# Altium PCB Analog_Project_Mixer_output.PcbDoc
Units mil, origin at the board's own origin, x right, y up, seen from the top; angles counter-clockwise.
Board outline 3300 x 2510.89 mil, 2 copper layers (Top Layer, Bottom Layer); 40 components, 27 nets, 106 pads, 7 vias.
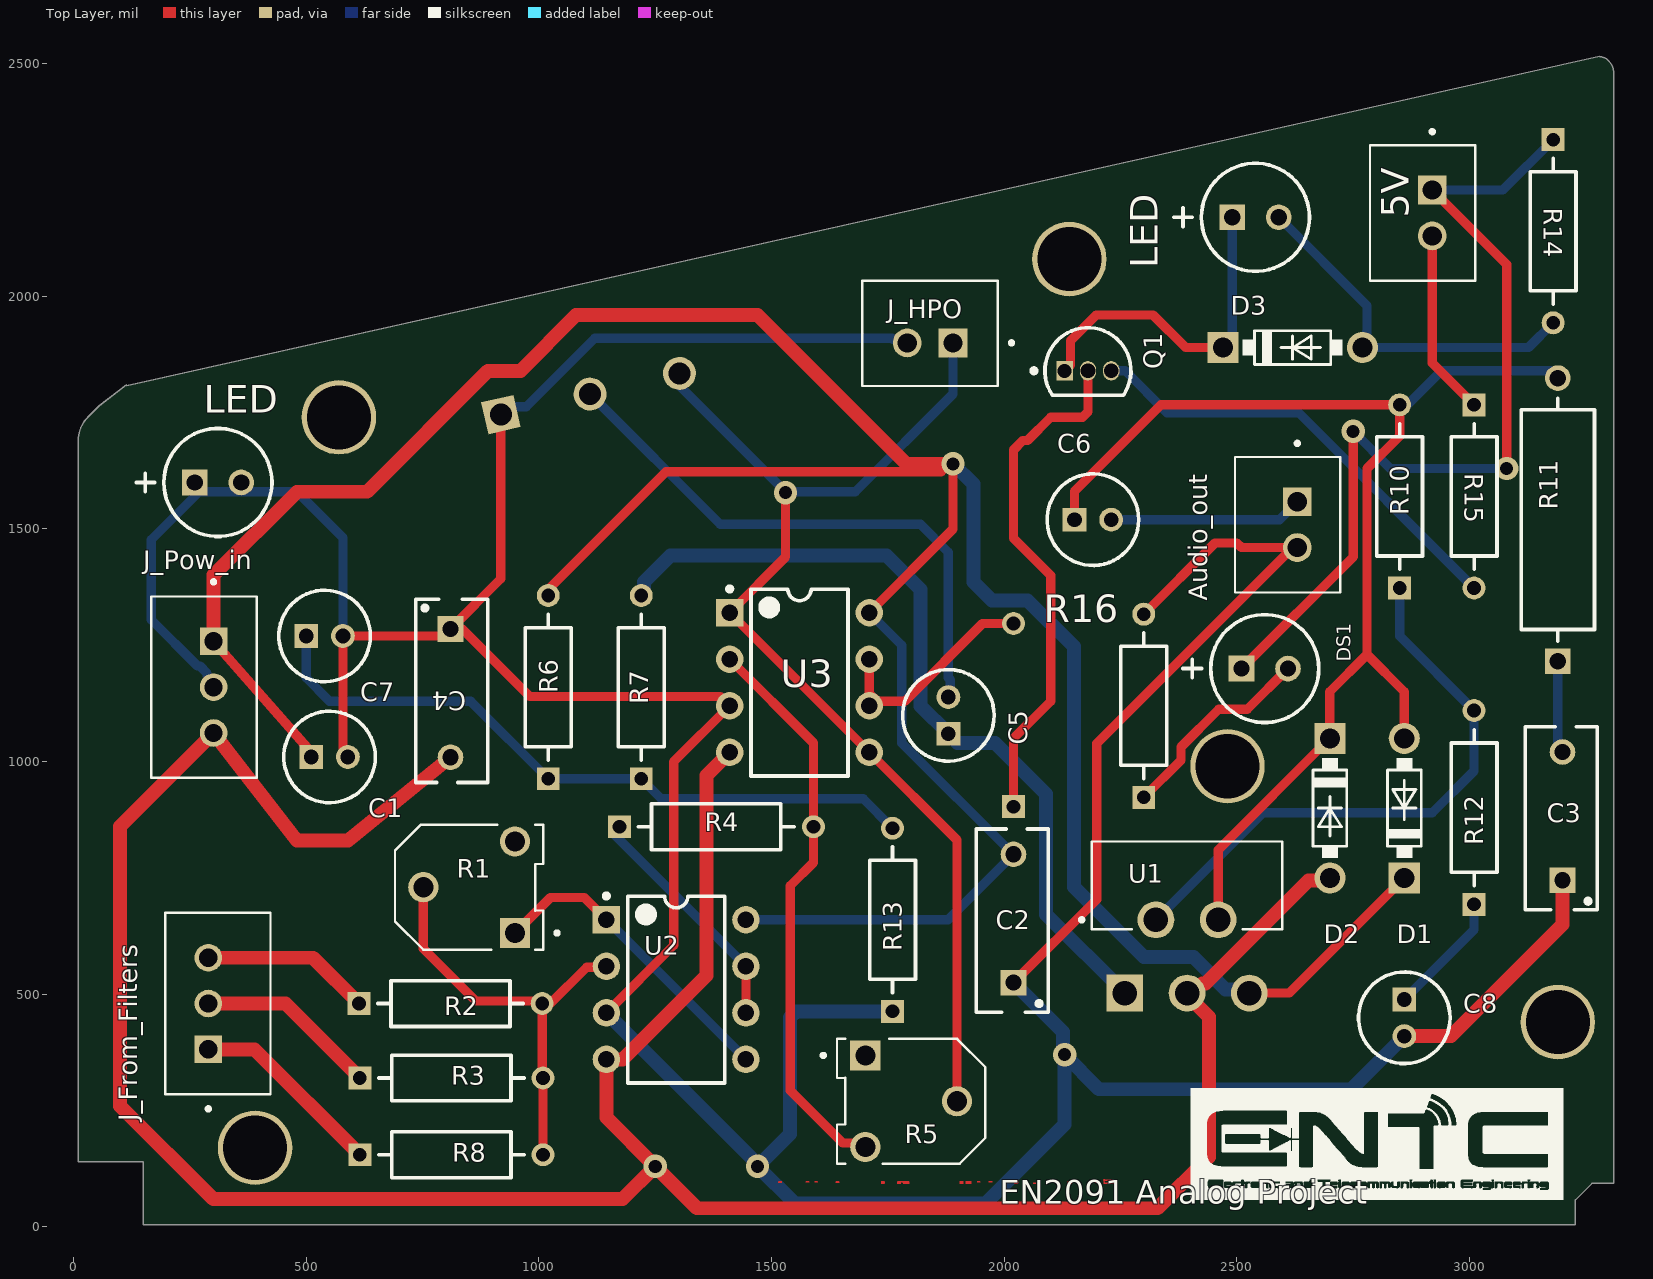
[diagram p0: Top Layer view]
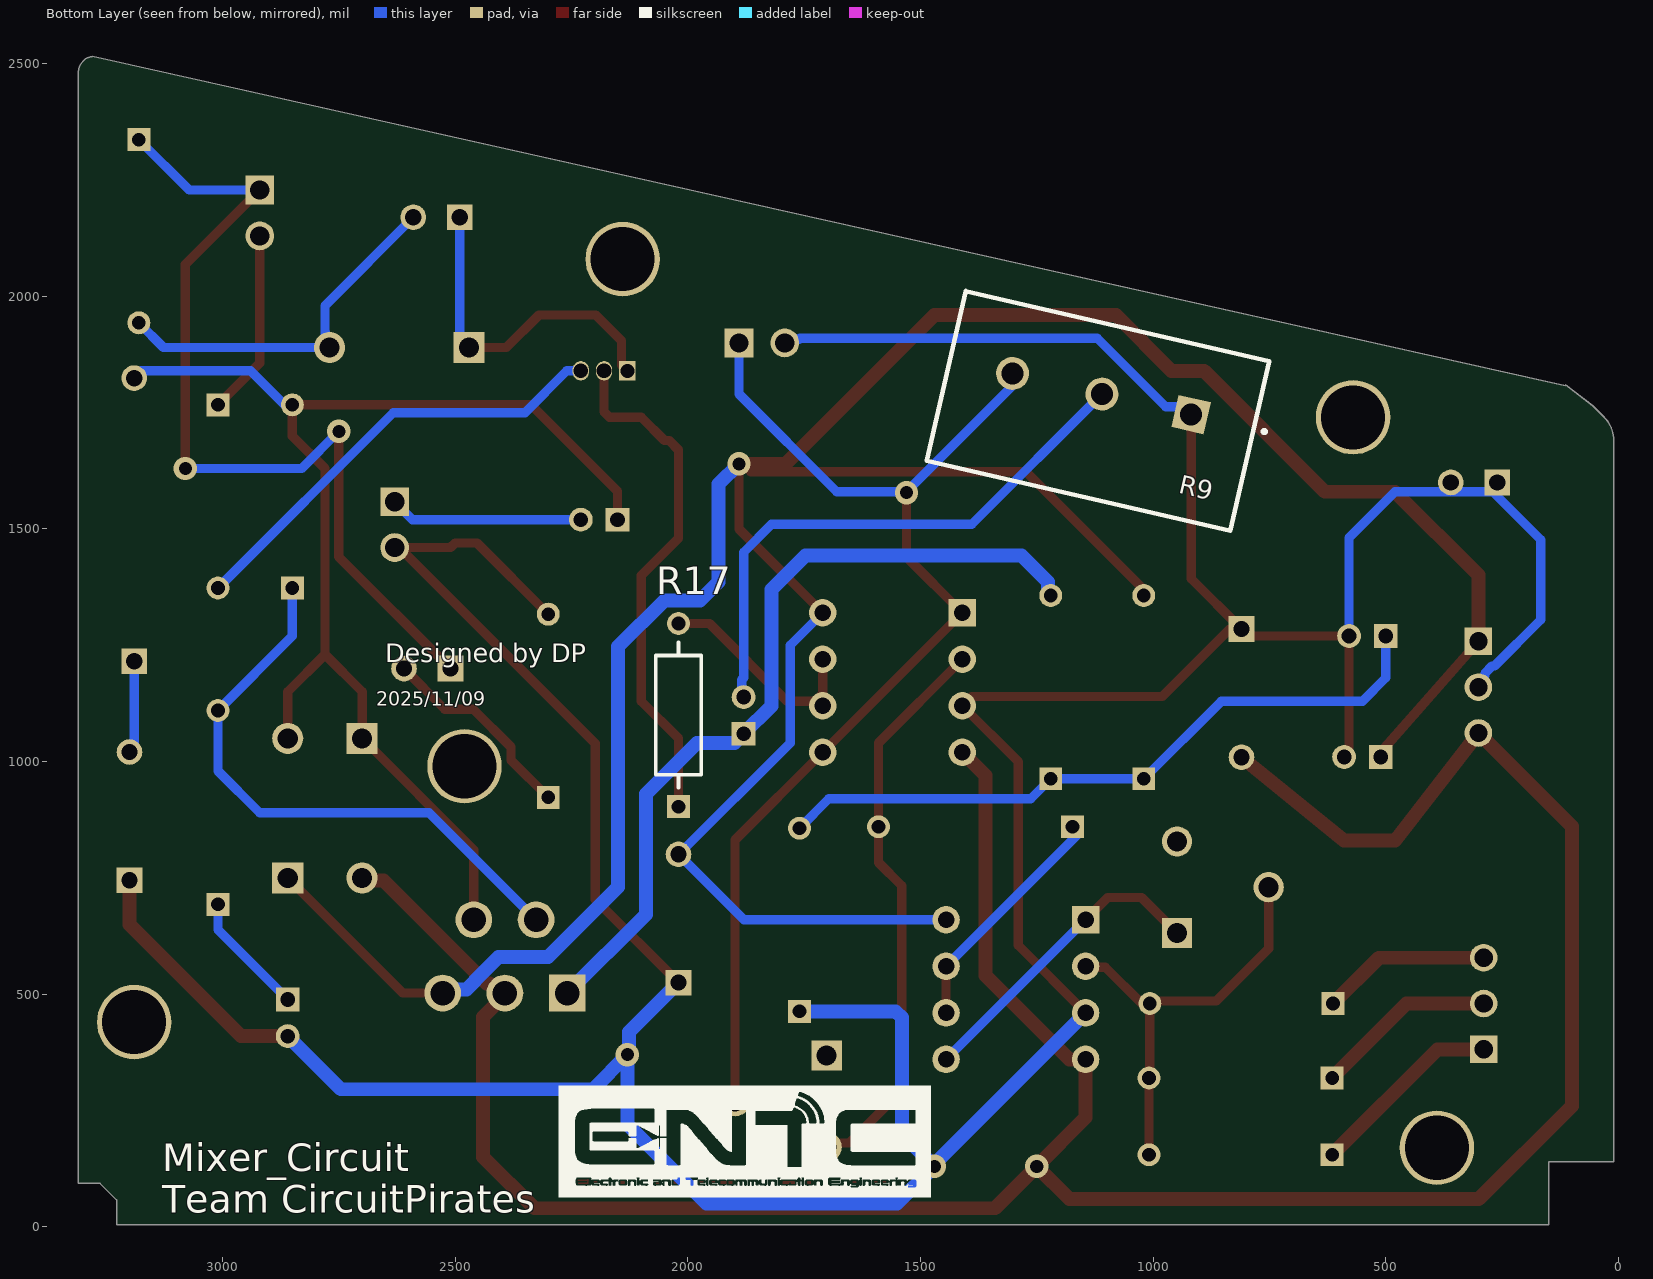
[diagram p1: Bottom Layer view, seen from below]
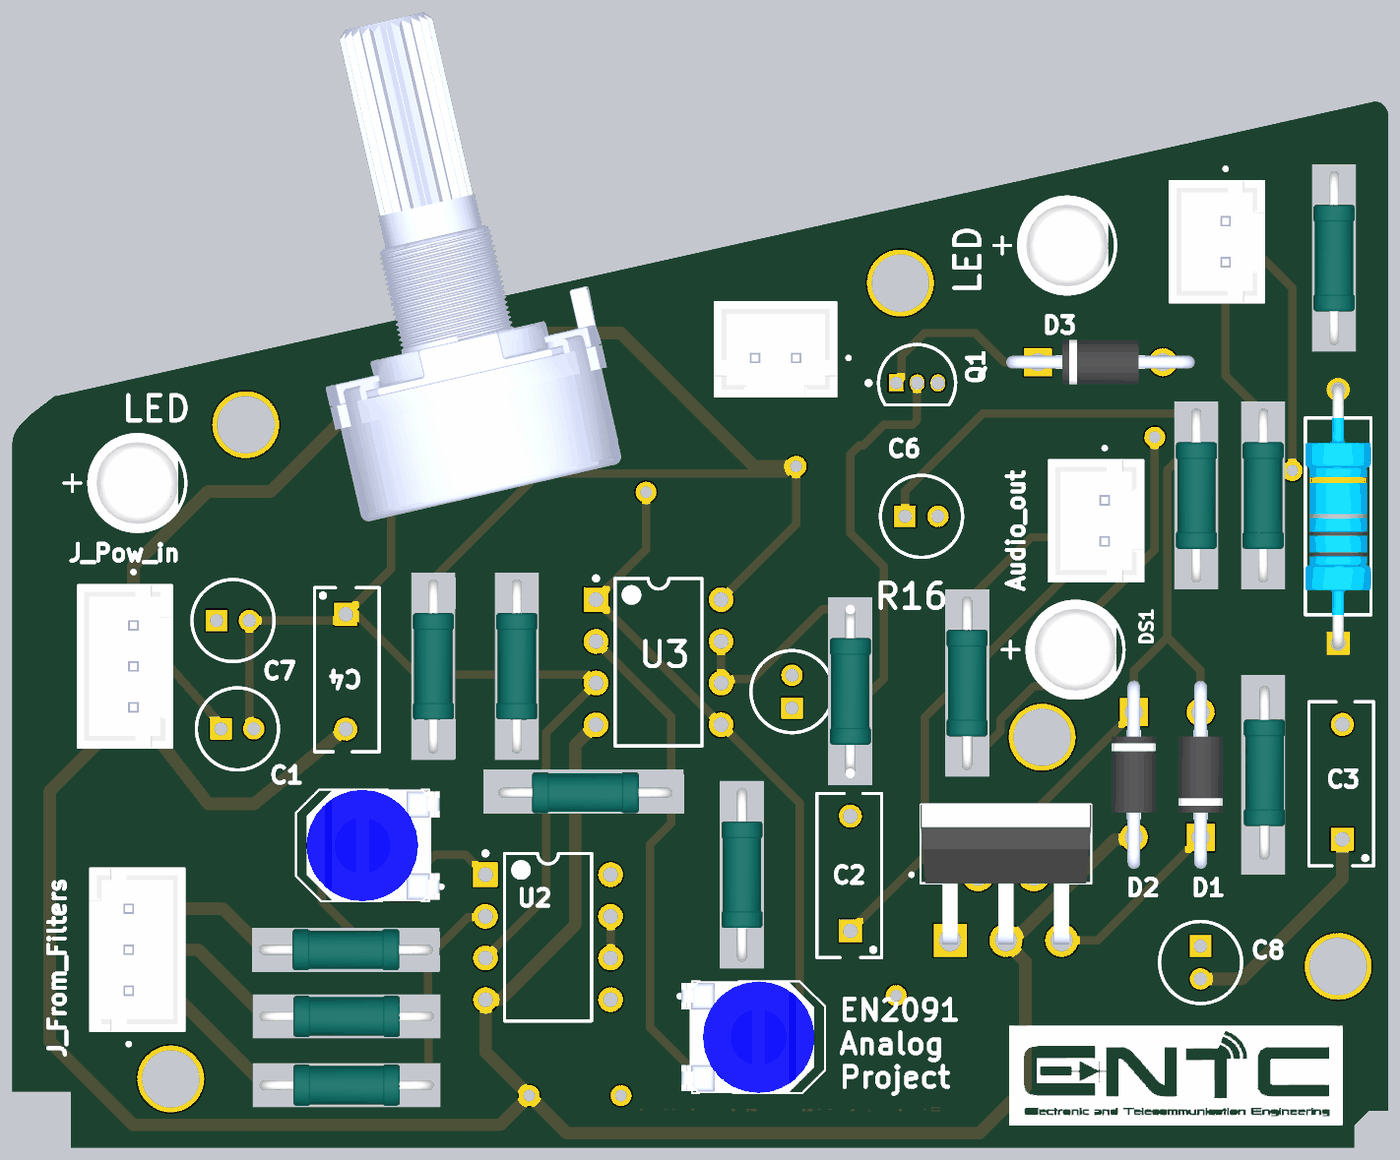
[diagram p2: 3D render of the assembled board from above, using the file's embedded part models]

## Layer stack, top to bottom
Top Solder: solder mask 0.4, Solder Resist, Dk 3.5
Top Layer: signal copper 1.4
Dielectric 1: dielectric 12.6, FR-4, Dk 4.8
Bottom Layer: signal copper 1.4
Bottom Solder: solder mask 0.4, Solder Resist, Dk 3.5

## Board outline
10,140 10,1690 cw(c82.43,1690) 31.21,1741.21 55,1765 54.99,1764.98 113.38,1809.71 113.74,1808.12 3279.8,2515.89 3280,2515 cw(c3280,2490.86) 3297.07,2507.93 3300,2505 cw(c3275.86,2480.86) 3310,2480.86 3310,93.28 3263.28,93.28 3227.93,57.93 3227.93,5.01 150,5.01 150,140

## Design rules (kind name [scope] priority, off if disabled: settings)
Clearance [All] p1: gap=10 ignorepadtopadclearanceinfootprint=FALSE
PolygonConnect [All] p1: connectstyle=Relief reliefconductorwidth=10 reliefentries=4 polygonreliefangle="90 Angle" airgapwidth=10
RoutingVias [All] p1: holewidth=28 width=50 viastyle="Through Hole" minholewidth=28 minwidth=50 maxholewidth=28 maxwidth=50
SolderMaskExpansion [All] p1: expansion=4 istentingtop=FALSE
SupplyNets "Schematic Supply Nets" [InNet('GND')] p1: voltage=0.000
Width [All] p1: maxlimit=30 minlimit=10 preferedwidth=20
30 further rules are at their usual default settings.

## Components (designator, comment, footprint, x,y, rotation, side; value= is the part's Value field where it differs from the comment)
5V "B2B-XH-A_(LF)(SN)" JST_B2B-XH-A_(LF)(SN) 2899.33,2179.21 r90 top
Audio_out "B2B-XH-A_(LF)(SN)" JST_B2B-XH-A_(LF)(SN) 2609.33,1509.21 r90 top
C1 "ECA1HM100" "10uF 25V" 550,1010 r0 top
C2 "100nF 50V Ceramic" "100nF Cap" 2020,660 r90 top
C3 "220nF 50V Ceramic" "100nF Cap" 3200,880 r90 top
C4 "100nF 50V Ceramic" "100nF Cap" 810,1150 r270 top
C5 "ECA1HM100" "10uF 25V" 1880,1099.37 r90 top
C6 "ECA1HM100" "10uF 25V" 2190.63,1520 r0 top
C7 "22uF 50V" "10uF 25V" 539.37,1270 r0 top
C8 "22uF" "10uF 25V" 2860,449.37 r270 top
D1 "1N4001" 1N400X 2860,900 r90 top
D2 "1N4001" 1N400X 2700,900 r270 top
D3 "1N4001" 1N400X 2620,1890 r0 top
DS1 "WP7113SGD" KING-WP7113SGD_V 2560,1200 r0 top
J_From_Filters "B3B-XH-A_(LF)(SN)" "JST_B3B-XH-A (LF)(SN)" 310,480 r270 top
J_HPO "B2B-XH-A_(LF)(SN)" JST_B2B-XH-A_(LF)(SN) 1840.79,1920.67 r0 top
J_Pow_in "B3B-XH-A_(LF)(SN)" "JST_B3B-XH-A (LF)(SN)" 280,1160 r90 top
LED "Comment" KING-WP7113SGD_V 310,1600 r0 top
LED "Comment" KING-WP7113SGD_V 2540,2170 r0 top
Q1 "BC547B" BC547B 2180,1840 r0 top
R1 "TRIM_pot" TRIM_Pot 850,730 r0 top
R2 "22K 0.25W" "0.25W Carbon film" 810,480 r0 top
R3 "22K 0.25W" "0.25W Carbon film" 811.85,320 r0 top
R4 "1K 0.25W" "0.50W Carbon film" 1370,860 r0 top value=1kΩ
R5 "TRIM_pot" TRIM_Pot 1800,270 r180 top
R6 "100K 0.25W" "0.25W Carbon film" 1020,1160 r90 top
R7 "100K 0.25W" "0.25W Carbon film" 1220,1160 r90 top
R8 "22K 0.25W" "0.25W Carbon film" 811.85,155 r0 top
R9 "Rotary_Pot" Rotary_pot 918.19,1745.72 r13 bottom
R10 "150K 0.25W" "0.25W Carbon film" 2850,1570 r90 top
R11 "1Ohm 5W" "0.5W resistor" 3190,1520 r90 top
R12 "4.7K 0.25W" "0.50W Carbon film" 3010,890 r90 top
R13 "100K 0.25W" "0.25W Carbon film" 1760,660 r90 top
R14 "1K 0.25W" "0.25W Carbon film" 3180,2140 r270 top value=1kΩ
R15 "1K 0.5W" "0.25W Carbon film" 3010,1570 r270 top value=1kΩ
R16 "1K 0.25W" "0.25W Carbon film" 2300,1120 r90 top value=1kΩ
R17 "1K 0.25W" "0.25W Carbon film" 2020,1100 r90 bottom value=1kΩ
U1 "TDA2030A" TDA2030A 2393.07,660 r0 top
U2 "NE5532AP" NE5532 1295,510 r0 top
U3 "NE5532AP" NE5532 1560,1170 r0 top

## Footprints (in the part's own frame and the unit in brackets; to place one, negate y for a bottom-side part, rotate by r counter-clockwise, add the part's x,y. Pads: shape width x height; smd on the part's side, far side on the other; paste and mask are expansions set on the pad)
"0.5W resistor" [mm]
  rect 1.4x1.4 hole 0.9 paste-2539.97 mask+0: 1(-7.73,0)
  round 1.4 hole 0.9 paste-2539.97 mask+0: 2(7.73,0)
  silkscreen extent -6.63,-2 6.63,2, body extent -8.53,-2.1 8.53,2.1, height 0.25
"0.25W Carbon film" [mm]
  rect 1.25x1.25 hole 0.75 paste-2539.97 mask+0: 1(-5,0)
  round 1.25 hole 0.75 paste-2539.97 mask+0: 2(5,0)
  silkscreen extent -3.98,-1.25 3.98,1.25, body extent -5.72,-1.35 5.72,1.35, height 0.25
"0.50W Carbon film" [mm]
  rect 1.25x1.25 hole 0.75 paste-2539.97 mask+0: 1(-5,0)
  round 1.25 hole 0.75 paste-2539.97 mask+0: 2(5.588,0)
  silkscreen extent -3.98,-1.25 4.53,1.25, body extent -5.35,-1.43 6.1,1.27, height 0.25
1N400X [mm]
  round 1.7 hole 1.1: A(3.81,0)
  rect 1.7x1.7 / inner round 1.7 / far side rect 1.7x1.7 hole 1.1: C(-3.81,0)
  silkscreen extent -2.72,-0.95 2.72,0.92, body extent -5.74,-1.35 5.74,1.35, height 2.74
"10uF 25V" [mm] "THD, 2-Leads, Dia 5mm, Body Length 11mm"
  rect 1.3x1.3 hole 0.8: 1(-1,0)
  round 1.3 hole 0.8: 2(1,0)
  silkscreen extent -2.5,-2.5 2.5,2.5, body extent -2.5,-2.5 2.5,2.5, height 12
"100nF Cap" [mil] "THD, 2-Leads, Body 4x2.6mm"
  rect 55x55 hole 35: 1(-135,0)
  round 55 hole 35: 2(140.59,0)
  silkscreen extent -199,-75 195,80, body extent -199,-76 192,80, height 10
BC547B [mm] "TO, 3-Leads, Body Dia 4.7mm, Pitch 1.27mm"
  rect 0.889x1.05 hole 0.762: 1(-1.27,0)
  oval 0.889x1.05 hole 0.8: 2(0,0) 3(1.27,0)
  silkscreen extent -3.07,-1.34 2.35,2.35, body extent -2.35,-1.33 2.36,2.36, height 7.87
JST_B2B-XH-A_(LF)(SN) [mm]
  rect 1.575x1.575 / inner round 1.575 / far side rect 1.575x1.575 hole 1.05: 1(1.25,-0.525)
  round 1.575 hole 1.05: 2(-1.25,-0.525)
  silkscreen extent -3.7,-2.88 4.54,2.88, body extent -3.7,-2.88 3.7,2.88, height 7
"JST_B3B-XH-A (LF)(SN)" [mm]
  rect 1.508x1.508 / inner round 1.508 / far side rect 1.508x1.508 hole 1: 1(2.5,-0.525)
  round 1.508 hole 1: 2(0,-0.525) 3(-2.5,-0.525)
  silkscreen extent -4.95,-2.88 5.85,2.88, body extent -4.95,-2.88 4.95,2.88, height 7
KING-WP7113SGD_V [mm] "THD, 2-Leads, Dia 5.9mm, Body Length 8.6mm"
  rect 1.4x1.4 hole 0.889: 1(-1.27,0)
  round 1.4 hole 0.889: 2(1.27,0)
  silkscreen extent -4.47,-2.95 2.95,2.95, body extent -2.95,-2.95 2.5,2.95, height 15.5
NE5532 [mm] "DIP, 8-Leads, Body 10.15x6.6mm, Pitch 2.54mm"
  rect 1.5x1.5 hole 0.9: 1(-3.81,3.81)
  round 1.5 hole 0.9: 2(-3.81,1.27) 3(-3.81,-1.27) 4(-3.81,-3.81) 5(3.81,-3.81) 6(3.81,-1.27) 7(3.81,1.27) 8(3.81,3.81)
  silkscreen extent -3.93,-5.1 2.65,5.23, body extent -3.95,-5.07 3.95,5.07, height 5.08
Rotary_pot [mm]
  rect 1.8x1.8 / inner round 1.8 / far side rect 1.8x1.8 hole 1.2: 1(0,0)
  round 1.8 hole 1.2: 2(5,0) 3(10,0)
  silkscreen extent -4.2,-3.81 13.5,5.69, body extent -3.41,-23.91 13.59,5.59, height 2.8
TDA2030A [mm]
  rect 2.01x2.01 / inner round 2.01 / far side rect 2.01x2.01 hole 1.34: 1(-3.4,-4)
  round 2.01 hole 1.34: 2(-1.7,0) 3(0,-4) 4(1.7,0) 5(3.4,-4)
  silkscreen extent -5.85,-0.53 5.2,4.28, body extent -5.2,-4.23 5.2,4.28, height 21.15
TRIM_Pot [mm]
  rect 1.65x1.65 / inner round 1.65 / far side rect 1.65x1.65 hole 1.1: 1(2.5,-2.5)
  round 1.65 hole 1.1: 2(-2.5,0) 3(2.5,2.5)
  silkscreen extent -4.05,-3.4 4.9,3.4, body extent -3.4,-3.4 4.7,3.4, height 8.38

## Part data
5V Audio_out J_HPO: "Connector Header Through Hole 2 position 0.098 (2.50mm)", Package=None, Check_prices=https://www.snapeda.com/parts/B2B-XH-A%20(LF)(SN)/JST+Sales+America+Inc./view-part/?ref=eda, MF="JST Sales", MP="B2B-XH-A (LF)(SN)", SnapEDA_Link=https://www.snapeda.com/parts/B2B-XH-A%20(LF)(SN)/JST+Sales+America+Inc./view-part/?ref=snap
C1: library part "100uF 25V", "Aluminum Electrolytic Capacitor, 10 uF, +/- 20%, 50 V, -40 to 85 degC, 2-Pin THD, RoHS, Bulk", Capacitance=10uF, Case/Package=Radial, Dielectric Material=Aluminium, Leakage Current=3uA, Manufacturer=Panasonic, Max Operating Temperature=85degC, Min Operating Temperature=-40degC, Package Description="2-Pin Radial Lead, Dia 5 mm, Height 12 mm", Package Quantity=200, Package Reference=CAPPR55-200-1100X500X1200, Ripple Current=65mA, Tolerance=20%, Voltage=50V, Datasheet URL=https://industrial.panasonic.com/cdbs/www-data/pdf/RDF0000/ABA0000C1218.pdf, Datasheet Version="Rev. 05, 10/2016", Diameter=5mm, Dissipation Factor=0.12%, Height=11mm, Height - Seated (Max)=0.472inch, Lead Diameter=0.5mm, Lead Free=LeadFree, Lead Pitch=2mm, Lead/Base Style=Straight, Length=11mm, Life (Hours)=2000Hour, Manufacturer URL=http://www.panasonic.com/, Mount=ThroughHole, Number of Pins=2, Packaging=Bulk, Radiation Hardening=No, REACH SVHC=NoSVHC, Ripple Current (AC)=65mA, RoHSCompliant=true, Termination=Radial, Voltage Rating=50V, Voltage Rating (DC)=50V
C2 C3 C4: "Ceramic Capacitor, 100 nF, +/- 10%, 50 V, -55 to 125 degC, 2-Pin THD, RoHS, Tape and Reel", Capacitance=0.1µF, Manufacturer=Vishay, Operating Temperature=-55°C~125°C, Package / Case=Radial, Package Description="2-Pin Through Hole Device, Body 4 x 2.6 mm", Package Reference=K104K15X7RF5TL2, Ratings=-, Standard Package=1, Temperature Coefficient=X7R, Tolerance=±10%, Voltage - Rated=50V, Applications=GeneralPurpose, Catalog Drawings=Mono-KapSide2-15_5.58Mono-KapSide1_15, Category=Capacitors, Datasheet URL=http://www.vishay.com/docs/45171/kseries.pdf, Datasheet Version=08/2013, Family=CeramicCapacitors, Features=-, Height - Seated (Max)="0.220\"(5.58mm)", Lead Spacing="0.098\"(2.50mm)", Lead Style=Straight, Manufacturer URL=http://www.vishay.com/, Mounting Technology=ThroughHole, Mounting Type=ThroughHole, Online Catalog=Mono-Kap™Series, Other Names=BC1084CT, Packaging=CutTape(CT), Series=Mono-Kap™K, Size / Dimension="0.157\"Lx0.098\"W(4.00mmx2.50mm)", Thickness (Max)=-
C5: library part "1uF 50v electrolytic", "Aluminum Electrolytic Capacitor, 10 uF, +/- 20%, 50 V, -40 to 85 degC, 2-Pin THD, RoHS, Bulk", Capacitance=10uF, Case/Package=Radial, Dielectric Material=Aluminium, Leakage Current=3uA, Manufacturer=Panasonic, Max Operating Temperature=85degC, Min Operating Temperature=-40degC, Package Description="2-Pin Radial Lead, Dia 5 mm, Height 12 mm", Package Quantity=200, Package Reference=CAPPR55-200-1100X500X1200, Ripple Current=65mA, Tolerance=20%, Voltage=50V, Datasheet URL=https://industrial.panasonic.com/cdbs/www-data/pdf/RDF0000/ABA0000C1218.pdf, Datasheet Version="Rev. 05, 10/2016", Diameter=5mm, Dissipation Factor=0.12%, Height=11mm, Height - Seated (Max)=0.472inch, Lead Diameter=0.5mm, Lead Free=LeadFree, Lead Pitch=2mm, Lead/Base Style=Straight, Length=11mm, Life (Hours)=2000Hour, Manufacturer URL=http://www.panasonic.com/, Mount=ThroughHole, Number of Pins=2, Packaging=Bulk, Radiation Hardening=No, REACH SVHC=NoSVHC, Ripple Current (AC)=65mA, RoHSCompliant=true, Termination=Radial, Voltage Rating=50V, Voltage Rating (DC)=50V
C6: library part "2000uF 25V", "Aluminum Electrolytic Capacitor, 10 uF, +/- 20%, 50 V, -40 to 85 degC, 2-Pin THD, RoHS, Bulk", Capacitance=10uF, Case/Package=Radial, Dielectric Material=Aluminium, Leakage Current=3uA, Manufacturer=Panasonic, Max Operating Temperature=85degC, Min Operating Temperature=-40degC, Package Description="2-Pin Radial Lead, Dia 5 mm, Height 12 mm", Package Quantity=200, Package Reference=CAPPR55-200-1100X500X1200, Ripple Current=65mA, Tolerance=20%, Voltage=50V, Datasheet URL=https://industrial.panasonic.com/cdbs/www-data/pdf/RDF0000/ABA0000C1218.pdf, Datasheet Version="Rev. 05, 10/2016", Diameter=5mm, Dissipation Factor=0.12%, Height=11mm, Height - Seated (Max)=0.472inch, Lead Diameter=0.5mm, Lead Free=LeadFree, Lead Pitch=2mm, Lead/Base Style=Straight, Length=11mm, Life (Hours)=2000Hour, Manufacturer URL=http://www.panasonic.com/, Mount=ThroughHole, Number of Pins=2, Packaging=Bulk, Radiation Hardening=No, REACH SVHC=NoSVHC, Ripple Current (AC)=65mA, RoHSCompliant=true, Termination=Radial, Voltage Rating=50V, Voltage Rating (DC)=50V
C7: "Aluminum Electrolytic Capacitor, 10 uF, +/- 20%, 50 V, -40 to 85 degC, 2-Pin THD, RoHS, Bulk", Capacitance=10uF, Case/Package=Radial, Dielectric Material=Aluminium, Leakage Current=3uA, Manufacturer=Panasonic, Max Operating Temperature=85degC, Min Operating Temperature=-40degC, Package Description="2-Pin Radial Lead, Dia 5 mm, Height 12 mm", Package Quantity=200, Package Reference=CAPPR55-200-1100X500X1200, Ripple Current=65mA, Tolerance=20%, Voltage=50V, Datasheet URL=https://industrial.panasonic.com/cdbs/www-data/pdf/RDF0000/ABA0000C1218.pdf, Datasheet Version="Rev. 05, 10/2016", Diameter=5mm, Dissipation Factor=0.12%, Height=11mm, Height - Seated (Max)=0.472inch, Lead Diameter=0.5mm, Lead Free=LeadFree, Lead Pitch=2mm, Lead/Base Style=Straight, Length=11mm, Life (Hours)=2000Hour, Manufacturer URL=http://www.panasonic.com/, Mount=ThroughHole, Number of Pins=2, Packaging=Bulk, Radiation Hardening=No, REACH SVHC=NoSVHC, Ripple Current (AC)=65mA, RoHSCompliant=true, Termination=Radial, Voltage Rating=50V, Voltage Rating (DC)=50V
C8: library part "2.2uF 50V", "Aluminum Electrolytic Capacitor, 10 uF, +/- 20%, 50 V, -40 to 85 degC, 2-Pin THD, RoHS, Bulk", Capacitance=10uF, Case/Package=Radial, Dielectric Material=Aluminium, Leakage Current=3uA, Manufacturer=Panasonic, Max Operating Temperature=85degC, Min Operating Temperature=-40degC, Package Description="2-Pin Radial Lead, Dia 5 mm, Height 12 mm", Package Quantity=200, Package Reference=CAPPR55-200-1100X500X1200, Ripple Current=65mA, Tolerance=20%, Voltage=50V, Datasheet URL=https://industrial.panasonic.com/cdbs/www-data/pdf/RDF0000/ABA0000C1218.pdf, Datasheet Version="Rev. 05, 10/2016", Diameter=5mm, Dissipation Factor=0.12%, Height=11mm, Height - Seated (Max)=0.472inch, Lead Diameter=0.5mm, Lead Free=LeadFree, Lead Pitch=2mm, Lead/Base Style=Straight, Length=11mm, Life (Hours)=2000Hour, Manufacturer URL=http://www.panasonic.com/, Mount=ThroughHole, Number of Pins=2, Packaging=Bulk, Radiation Hardening=No, REACH SVHC=NoSVHC, Ripple Current (AC)=65mA, RoHSCompliant=true, Termination=Radial, Voltage Rating=50V, Voltage Rating (DC)=50V
D1 D2 D3: "DIODE, STANDARD, 1A, 50V, DO-204AL-2; Diode Type: Standard Recovery; Diode Config", Average Rectified Current=1A, Forward Voltage=1.1V, Manufacturer=Vishay, Manufacturer Part Number=1N4001-E3/73, Max Forward Surge Current (Ifsm)=30A, Max Junction Temperature (Tj)=150°C, Max Repetitive Reverse Voltage (Vrrm)=50V, Min Operating Temperature=-50°C, Package="DO-41 Vishay Semiconductor", Peak Non-Repetitive Surge Current=45A, Peak Reverse Current=5µA, Supplier Part Number=1N4001-E3/73GICT-ND, Category="Rectifier Diodes", Check_prices=https://www.snapeda.com/parts/1N4007E-E3/64/Vishay/view-part/?ref=eda, China RoHS=Non-Compliant, ComponentLink1Description=https://datasheet.octopart.com:443/1N4001-E3-73-Vishay-datasheet-168682104.pdf?src-supplier=Newark, ComponentLink1URL=https://datasheet.octopart.com:443/1N4001-E3-73-Vishay-datasheet-168682104.pdf?src-supplier=Newark, ComponentLink2Description=https://datasheet.octopart.com:443/1N4001-E3-73-Vishay-datasheet-11547366.pdf?src-supplier=Newark, ComponentLink2URL=https://datasheet.octopart.com:443/1N4001-E3-73-Vishay-datasheet-11547366.pdf?src-supplier=Newark, ComponentLink3Description=https://datasheet.octopart.com:443/1N4001-E3-73-Vishay-datasheet-8381009.pdf?src-supplier=Newark, ComponentLink3URL=https://datasheet.octopart.com:443/1N4001-E3-73-Vishay-datasheet-8381009.pdf?src-supplier=Newark, ComponentLink4Description=https://datasheet.octopart.com:443/1N4001-E3-73-Vishay-datasheet-519570.pdf?src-supplier=Newark, ComponentLink4URL=https://datasheet.octopart.com:443/1N4001-E3-73-Vishay-datasheet-519570.pdf?src-supplier=Newark, ComponentLink5Description=https://datasheet.octopart.com:443/1N4001-E3-73-Vishay-datasheet-41303593.pdf?src-supplier=Newark, ComponentLink5URL=https://datasheet.octopart.com:443/1N4001-E3-73-Vishay-datasheet-41303593.pdf?src-supplier=Newark, ComponentLink6Description=https://datasheet.octopart.com:443/1N4001-E3-73-Vishay-datasheet-62317716.pdf?src-supplier=element14+APAC, ComponentLink6URL=https://datasheet.octopart.com:443/1N4001-E3-73-Vishay-datasheet-62317716.pdf?src-supplier=element14+APAC, ComponentLink7Description=https://datasheet.octopart.com:443/1N4001-E3-73-Vishay-datasheet-41195573.pdf?src-supplier=Farnell, ComponentLink7URL=https://datasheet.octopart.com:443/1N4001-E3-73-Vishay-datasheet-41195573.pdf?src-supplier=Farnell, ComponentLink8Description=http://sigma.octopart.com:80/rohs_statement/Vishay-company-15.pdf?src-supplier=Compliance+Statements, ComponentLink8URL=http://sigma.octopart.com:80/rohs_statement/Vishay-company-15.pdf?src-supplier=Compliance+Statements, Contact Plating=Tin, Current=1A, Element Configuration=Single, Forward Current=1A, Height=2.7mm, Length=5.2mm, Lifecycle Status=Production, Max Operating Temperature=150°C, Max Output current=1A, Max Reverse Voltage (DC)=50V, Max Surge Current=30A, MF="Vishay Semiconductor", Mounting Technology="Through Hole", MP=1N4007E-E3/64, Number of Elements=1, Number of Terminals=2, Pins=2, Pricing="1=0.15, 10=0.101, 100=0.0827, 500=0.06926 (USD)", Radiation Hardening=No, REACH SVHC=No, Reverse Standoff Voltage=50V, Reverse Voltage=50V, RoHS=Compliant, Schedule B="8541100080, 8541100080|8541100080|8541100080|8541100080|8541100080", SnapEDA_Link=https://www.snapeda.com/parts/1N4007E-E3/64/Vishay/view-part/?ref=snap, Stock=29129, Supplier=DigiKey, Voltage=50V, Width=2.7mm
DS1: library part CMP-007-00010-2, "LED Green, 62.5 mW, 25 mA, -40 to 85 degC, 2-Pin THD, RoHS, Bulk", Case/Package=Radial, Colour=Green, Forward Voltage=2.2V, Manufacturer=Kingbright, Package Description="2-Pin Through Hole Device, Dia 5.9 mm, Body Length 8.6 mm", Package Quantity=1000, Power=62.5mW, Datasheet URL=http://www.kingbrightusa.com/images/catalog/SPEC/WP7113SGD.pdf, Datasheet Version="Rev. 6B, 01/2015", Illumination Colour=Green, Lens Style=Dome, Luminous Intensity=40mcd, Mounting Technology=TH, Nominal Vf=2.2V, Package Reference=WP7113SGD, Packaging=Bulk, RoHS Compliant=True, Viewing Angle=30degrees
J_From_Filters J_Pow_in: "Connector Header Through Hole 3 position 0.098 (2.50mm)", Package=None, Check_prices=https://www.snapeda.com/parts/B3B-XH-A%20(LF)(SN)/JST+Sales+America+Inc./view-part/?ref=eda, MF="JST Sales America Inc.", MP="B3B-XH-A (LF)(SN)", SnapEDA_Link=https://www.snapeda.com/parts/B3B-XH-A%20(LF)(SN)/JST+Sales+America+Inc./view-part/?ref=snap
Q1: "BC547 Series 45 V CE Breakdown .1 A NPN Epitaxial Silicon Transistor - TO-92", Case/Package=TO-92, Clock Frequency=300MHz, Collector Base Voltage (VCBO)=50V, Collector Emitter Breakdown Voltage=45V, Collector Emitter Saturation Voltage=250mV, Current=1A, Current Rating=100mA, Emitter Base Voltage (VEBO)=6V, Manufacturer="On Semiconductor", Manufacturer Lifecycle Status=ACTIVE, Manufacturer Package Identifier=MKT-ZA03DREV3, Max Operating Temperature=150°C, Max Power Dissipation=625mW, Min Operating Temperature=-65°C, Power Dissipation=500mW, Supplier Part Number=BC547BFS-ND, Voltage=40V, Category=BJTs, China RoHS=Compliant, Collector Emitter Voltage (VCEO)=45V, ComponentLink1Description="Manufacturer URL", ComponentLink1URL=http://www.onsemi.com/, ComponentLink2Description=Datasheet, ComponentLink2URL=http://www.onsemi.com/pub_link/Collateral/BC546-D.PDF, ComponentLink3Description="Package Specification", ComponentLink3URL=http://www.onsemi.cn/pub_link/Collateral/2N6426-D.PDF, ComponentLink4Description=https://datasheet.octopart.com:443/BC547B-onsemi-datasheet-180957945.pdf?src-supplier=IHS, ComponentLink4URL=https://datasheet.octopart.com:443/BC547B-onsemi-datasheet-180957945.pdf?src-supplier=IHS, ComponentLink5Description=https://datasheet.octopart.com:443/BC547B-Fairchild-Semiconductor-datasheet-34208604.pdf?src-supplier=IHS, ComponentLink5URL=https://datasheet.octopart.com:443/BC547B-Fairchild-Semiconductor-datasheet-34208604.pdf?src-supplier=IHS, ComponentLink6Description=https://datasheet.octopart.com:443/BC547B-ON-Semiconductor-datasheet-11548122.pdf?src-supplier=Master+Electronics, ComponentLink6URL=https://datasheet.octopart.com:443/BC547B-ON-Semiconductor-datasheet-11548122.pdf?src-supplier=Master+Electronics, ComponentLink7Description=https://datasheet.octopart.com:443/BC547B-ON-Semiconductor-datasheet-26353630.pdf?src-supplier=Upverter, ComponentLink7URL=https://datasheet.octopart.com:443/BC547B-ON-Semiconductor-datasheet-26353630.pdf?src-supplier=Upverter, ComponentLink8Description=https://datasheet.octopart.com:443/BC547B-ON-Semiconductor-datasheet-574670.pdf?src-supplier=onsemi, ComponentLink8URL=https://datasheet.octopart.com:443/BC547B-ON-Semiconductor-datasheet-574670.pdf?src-supplier=onsemi, ComponentLink9Description=https://datasheet.octopart.com:443/BC547B-ON-Semiconductor-datasheet-151678557.pdf?src-supplier=onsemi, ComponentLink9URL=https://datasheet.octopart.com:443/BC547B-ON-Semiconductor-datasheet-151678557.pdf?src-supplier=onsemi, ComponentLink10Description=https://datasheet.octopart.com:443/BC547B-ON-Semiconductor-datasheet-86688575.pdf?src-supplier=onsemi, ComponentLink10URL=https://datasheet.octopart.com:443/BC547B-ON-Semiconductor-datasheet-86688575.pdf?src-supplier=onsemi, ComponentLink11Description=https://datasheet.octopart.com:443/BC547B-Fairchild-datasheet-7074.pdf?src-supplier=Fairchild+Semiconductor, ComponentLink11URL=https://datasheet.octopart.com:443/BC547B-Fairchild-datasheet-7074.pdf?src-supplier=Fairchild+Semiconductor, ComponentLink12Description=https://sigma.octopart.com:443/8329026/technical_drawing/Fairchild-Semiconductor-BC547B.pdf?src-supplier=Fairchild+Semiconductor, ComponentLink12URL=https://sigma.octopart.com:443/8329026/technical_drawing/Fairchild-Semiconductor-BC547B.pdf?src-supplier=Fairchild+Semiconductor, ComponentLink13Description=https://datasheet.octopart.com:443/BC547B-ON-Semiconductor-datasheet-105062517.pdf?src-supplier=Future+Electronics, ComponentLink13URL=https://datasheet.octopart.com:443/BC547B-ON-Semiconductor-datasheet-105062517.pdf?src-supplier=Future+Electronics, ComponentLink14Description=https://datasheet.octopart.com:443/BC547B-ON-Semiconductor-datasheet-86684081.pdf?src-supplier=element14+APAC, ComponentLink14URL=https://datasheet.octopart.com:443/BC547B-ON-Semiconductor-datasheet-86684081.pdf?src-supplier=element14+APAC, ComponentLink15Description=https://datasheet.octopart.com:443/BC547B-Fairchild-Semiconductor-datasheet-7537324.pdf?src-supplier=Farnell, ComponentLink15URL=https://datasheet.octopart.com:443/BC547B-Fairchild-Semiconductor-datasheet-7537324.pdf?src-supplier=Farnell, ComponentLink16Description=https://datasheet.octopart.com:443/BC547B-Fairchild-Semiconductor-datasheet-637514.pdf?src-supplier=Farnell, ComponentLink16URL=https://datasheet.octopart.com:443/BC547B-Fairchild-Semiconductor-datasheet-637514.pdf?src-supplier=Farnell, ComponentLink17Description=https://datasheet.octopart.com:443/BC547B-ON-Semiconductor-datasheet-6055.pdf?src-supplier=DigiKey, ComponentLink17URL=https://datasheet.octopart.com:443/BC547B-ON-Semiconductor-datasheet-6055.pdf?src-supplier=DigiKey, ComponentLink18Description=https://datasheet.octopart.com:443/BC547B-Fairchild-Semiconductor-datasheet-67878763.pdf?src-supplier=Newark, ComponentLink18URL=https://datasheet.octopart.com:443/BC547B-Fairchild-Semiconductor-datasheet-67878763.pdf?src-supplier=Newark, ComponentLink19Description=https://datasheet.octopart.com:443/BC547B-Fairchild-Semiconductor-datasheet-78861862.pdf?src-supplier=Newark, ComponentLink19URL=https://datasheet.octopart.com:443/BC547B-Fairchild-Semiconductor-datasheet-78861862.pdf?src-supplier=Newark, ComponentLink20Description=http://sigma.octopart.com:80/150605340/rohs_statement/ON-Semiconductor-BC547B.pdf?src-supplier=Compliance+Statements, ComponentLink20URL=http://sigma.octopart.com:80/150605340/rohs_statement/ON-Semiconductor-BC547B.pdf?src-supplier=Compliance+Statements, ComponentLink21Description=http://sigma.octopart.com:80/23426736/rohs_statement/Fairchild-Semiconductor-BC547B.pdf?src-supplier=Compliance+Statements, ComponentLink21URL=http://sigma.octopart.com:80/23426736/rohs_statement/Fairchild-Semiconductor-BC547B.pdf?src-supplier=Compliance+Statements, ComponentLink22Description=http://sigma.octopart.com:80/23426737/materials_sheet/Fairchild-Semiconductor-BC547B.pdf?src-supplier=Compliance+Statements, ComponentLink22URL=http://sigma.octopart.com:80/23426737/materials_sheet/Fairchild-Semiconductor-BC547B.pdf?src-supplier=Compliance+Statements, ComponentLink23Description=http://sigma.octopart.com:80/33052967/reach_statement/Fairchild-Semiconductor-BC547B.pdf?src-supplier=Compliance+Statements, ComponentLink23URL=http://sigma.octopart.com:80/33052967/reach_statement/Fairchild-Semiconductor-BC547B.pdf?src-supplier=Compliance+Statements, ComponentLink24Description=http://sigma.octopart.com:80/33053049/materials_sheet/Fairchild-Semiconductor-BC547B.pdf?src-supplier=Compliance+Statements, ComponentLink24URL=http://sigma.octopart.com:80/33053049/materials_sheet/Fairchild-Semiconductor-BC547B.pdf?src-supplier=Compliance+Statements, ComponentLink25Description=http://sigma.octopart.com:80/reach_statement/ON-Semiconductor-company-79.pdf?src-supplier=Compliance+Statements, ComponentLink25URL=http://sigma.octopart.com:80/reach_statement/ON-Semiconductor-company-79.pdf?src-supplier=Compliance+Statements, ComponentLink26Description=http://sigma.octopart.com:80/rohs_statement/Fairchild-Semiconductor-company-11.pdf?src-supplier=Compliance+Statements, ComponentLink26URL=http://sigma.octopart.com:80/rohs_statement/Fairchild-Semiconductor-company-11.pdf?src-supplier=Compliance+Statements, ComponentLink27Description=http://sigma.octopart.com:80/rohs_statement/Fairchild-Semiconductor-company-10.pdf?src-supplier=Compliance+Statements, ComponentLink27URL=http://sigma.octopart.com:80/rohs_statement/Fairchild-Semiconductor-company-10.pdf?src-supplier=Compliance+Statements, ComponentLink28Description=http://sigma.octopart.com:80/reach_statement/Fairchild-Semiconductor-company-9.pdf?src-supplier=Compliance+Statements, ComponentLink28URL=http://sigma.octopart.com:80/reach_statement/Fairchild-Semiconductor-company-9.pdf?src-supplier=Compliance+Statements, ComponentLink29Description=https://octopart.com:443/opatz8j6/c1?t=Wh0HLASlSBeZaUiz3GayB3OWGMt4DmM6z_ZHtko5fz1ybrcnR6Q5ICyIXUvgUGErCw6SavT9HUoF3FtEPIgT2pvj8H4VDy6Hd6AutYjKCWRDmj_avBiiD6MDUQmCYL58rHETmzfTDop89euoDPYG6n7EpgAR1EK3peF7mSphNTJXxp5tzGfvJXgXxfT9ZK4QqXLLKUAGmSHxm0lcR-ipPWnbnyTSZFp2lUUaaeJmZTWgQRT_ULvLk_dzj5KOmkpKoSPCuaKPqYqmAx_zP3CUHOEPTgvu2NcgXvP0ixksM_8BtOyVVK_YA_YYSP8TmFX2wgVu4HOJ81tq2U284no1t_dGaXacBRgQ&src-supplier=Compliance+Statements, ComponentLink29URL=https://octopart.com:443/opatz8j6/c1?t=Wh0HLASlSBeZaUiz3GayB3OWGMt4DmM6z_ZHtko5fz1ybrcnR6Q5ICyIXUvgUGErCw6SavT9HUoF3FtEPIgT2pvj8H4VDy6Hd6AutYjKCWRDmj_avBiiD6MDUQmCYL58rHETmzfTDop89euoDPYG6n7EpgAR1EK3peF7mSphNTJXxp5tzGfvJXgXxfT9ZK4QqXLLKUAGmSHxm0lcR-ipPWnbnyTSZFp2lUUaaeJmZTWgQRT_ULvLk_dzj5KOmkpKoSPCuaKPqYqmAx_zP3CUHOEPTgvu2NcgXvP0ixksM_8BtOyVVK_YA_YYSP8TmFX2wgVu4HOJ81tq2U284no1t_dGaXacBRgQ&src-supplier=Compliance+Statements, ComponentLink30Description=https://octopart.com:443/opatz8j6/c1?t=da9r1jQd4zQjw_w6ZlLw14OT-Olb6rZnis77aO1bwvVJE9VZLxP6k91EfUxso6SyEwgc3mQHYqgqdzaIBeeuW6l6C_PMd9OWXk0hzlafdbDo9oRHF78bObiDlVopW-MpZGN62L_bqtt5v3wnCVRPCsoOPixPbBBS4UuAheGlixJp5OmgHHax5z3G59s1jVXQoRaabBS0w2aQZyxUe6oqNMDLdkAlYBf0kYt772jkopSlA7hHQqKSeeywQR1QCbJX8_FT8PJ-KGPUcpOn56JQWBh67x6J5z68Z1FSgYjIuPfF-N0YtkThmqYJeUavB1H-_6-x659USCRP7rJ3bZDcPIEc1AdHEuc&src-supplier=Compliance+Statements, ComponentLink30URL=https://octopart.com:443/opatz8j6/c1?t=da9r1jQd4zQjw_w6ZlLw14OT-Olb6rZnis77aO1bwvVJE9VZLxP6k91EfUxso6SyEwgc3mQHYqgqdzaIBeeuW6l6C_PMd9OWXk0hzlafdbDo9oRHF78bObiDlVopW-MpZGN62L_bqtt5v3wnCVRPCsoOPixPbBBS4UuAheGlixJp5OmgHHax5z3G59s1jVXQoRaabBS0w2aQZyxUe6oqNMDLdkAlYBf0kYt772jkopSlA7hHQqKSeeywQR1QCbJX8_FT8PJ-KGPUcpOn56JQWBh67x6J5z68Z1FSgYjIuPfF-N0YtkThmqYJeUavB1H-_6-x659USCRP7rJ3bZDcPIEc1AdHEuc&src-supplier=Compliance+Statements, Contact Plating="Copper, Silver, Tin", DatasheetVersion="Rev. 7", Element Configuration=Single, Frequency=300MHz, fT Min (MHz)=150, Gain Bandwidth Product=100MHz, Height=4.58mm, hFE Min=200, IC Continuous (A)=0.1, Lead Free="Lead Free", Length=4.58mm, Lifecycle Status=Production, Manufacturer Part Number=BC547B, Max Breakdown Voltage=45V, Max Collector Current=100mA, Mounting Technology="Through Hole", Number of Elements=1, Number of Terminals=3, PackageDescription="3-Pin Transistor Outline, Body 4.825 x 3.685 mm, Pitch 1.27 mm", PackageReference=TO-92-3-29-11_AM_SL, PackageVersion="Rev. AM", Packaging=Bulk, Packing="Bulk Box", PartNumber=BC547B, Pins=3, Polarity=NPN, Pricing="1=0.38, 10=0.234, 100=0.1472, 500=0.10944, 1000=0.09723, 2000=0.08693, 5000=0.07576, 10000=0.06884, 50000=0.05673 (USD)", Radiation Hardening=No, REACH SVHC=Yes, RoHS=FALSE, Stock=6659, Supplier=DigiKey, Transition Frequency=300MHz, Voltage Rating (DC)=45V, Weight=200.005886mg, Width=3.86mm
R1 R5: "TRIMMER - 6MM ROUND, SINGLE-TURN,CERMET, 10K OHMS", Package="3306F Bourns", Check_prices=https://www.snapeda.com/parts/3306F-1-103/Bourns/view-part/?ref=eda, MF=Bourns, MP=3306F-1-103, SnapEDA_Link=https://www.snapeda.com/parts/3306F-1-103/Bourns/view-part/?ref=snap
R4 R14 R15 R16 R17: "Fixed Resistor, Metal Film, 0.25W, 1000ohm, 250V, 1% +/-Tol, 100ppm/Cel, Through Hole Mount", Case/Package=Axial, Manufacturer="Yageo Group", Manufacturer Part Number=MFR-25FBF52-1K, Max Operating Temperature=155°C, Max Power Dissipation=250mW, Min Operating Temperature=-55°C, Temperature Coefficient=100ppm/°C, Tolerance=1%, Voltage Rating=250V, Voltage Rating (DC)=200V, Category="Through-Hole Resistors", China RoHS=Compliant, ComponentLink1Description=https://datasheet.octopart.com:443/MFR-25FBF52-1K-Yageo-datasheet-175665672.pdf?src-supplier=IHS, ComponentLink1URL=https://datasheet.octopart.com:443/MFR-25FBF52-1K-Yageo-datasheet-175665672.pdf?src-supplier=IHS, ComponentLink2Description=https://datasheet.octopart.com/MFR-25FBF52-1K-Yageo-datasheet-28066692.pdf, ComponentLink2URL=https://datasheet.octopart.com/MFR-25FBF52-1K-Yageo-datasheet-28066692.pdf, ComponentLink3Description=https://datasheet.octopart.com:443/MFR-25FBF52-1K-Yageo-datasheet-12510115.pdf?src-supplier=Upverter, ComponentLink3URL=https://datasheet.octopart.com:443/MFR-25FBF52-1K-Yageo-datasheet-12510115.pdf?src-supplier=Upverter, ComponentLink4Description=https://datasheet.octopart.com:443/MFR-25FBF52-1K-Yageo-datasheet-165493774.pdf?src-supplier=Future+Electronics, ComponentLink4URL=https://datasheet.octopart.com:443/MFR-25FBF52-1K-Yageo-datasheet-165493774.pdf?src-supplier=Future+Electronics, ComponentLink5Description=https://datasheet.octopart.com:443/MFR-25FBF52-1K-Yageo-datasheet-155367622.pdf?src-supplier=Future+Electronics, ComponentLink5URL=https://datasheet.octopart.com:443/MFR-25FBF52-1K-Yageo-datasheet-155367622.pdf?src-supplier=Future+Electronics, ComponentLink6Description=https://datasheet.octopart.com:443/MFR-25FBF52-1K-Yageo-datasheet-17233670.pdf?src-supplier=Future+Electronics, ComponentLink6URL=https://datasheet.octopart.com:443/MFR-25FBF52-1K-Yageo-datasheet-17233670.pdf?src-supplier=Future+Electronics, ComponentLink7Description=https://datasheet.octopart.com:443/MFR-25FBF52-1K-Yageo-datasheet-137700554.pdf?src-supplier=Future+Electronics, ComponentLink7URL=https://datasheet.octopart.com:443/MFR-25FBF52-1K-Yageo-datasheet-137700554.pdf?src-supplier=Future+Electronics, ComponentLink8Description=http://sigma.octopart.com:80/conflict_mineral_statement/Yageo-company-3.pdf?src-supplier=Compliance+Statements, ComponentLink8URL=http://sigma.octopart.com:80/conflict_mineral_statement/Yageo-company-3.pdf?src-supplier=Compliance+Statements, ComponentLink9Description=http://sigma.octopart.com:80/rohs_statement/Yageo-company-2.pdf?src-supplier=Compliance+Statements, ComponentLink9URL=http://sigma.octopart.com:80/rohs_statement/Yageo-company-2.pdf?src-supplier=Compliance+Statements, Composition="Metal Film", Diameter=2.4mm, Lead Diameter=550µm, Lead Free="Lead Free", Lead Length=28mm, Length=6.2992mm, Lifecycle Status=Production, Mounting Technology="Through Hole", Number of Terminals=2, Number of Terminations=2, Packaging=Bulk, Pins=2, Power Dissipation=250mW, Power Rating=250mW, Pricing="1=0.00766, 10=0.00745, 30=0.00726, 50=0.00713, 100=0.00696 (USD)", REACH SVHC=Yes, RoHS=Compliant, Schedule B="8533210090, 8533210090|8533210090|8533210090|8533210090|8533210090|8533210090|8533210090|8533210090|8533210090|8533210090|8533210090|8533210090|8533210090|8533210090|8533210090|8533210090|8533210090|8533210090|8533210090|8533210090|8533210090|8533210090|8533210090|85", Stock=714, Supplier=Avnet, Supplier Part Number=MFR-25FBF52-1K, Termination=Axial, Width=6.3mm, Working Voltage=250V
R9: "16.5 mm, Horizontal, Linear, 50 kÎ©, Through Hole, Knurled Shaft Single Section Rotary Potentiometer", Package=Package, Check_prices=https://www.snapeda.com/parts/PTN16-A50220K1B1/Same+Sky/view-part/?ref=eda, MF="Same Sky", MP=PTN16-A50220K1B1, SnapEDA_Link=https://www.snapeda.com/parts/PTN16-A50220K1B1/Same+Sky/view-part/?ref=snap
R11: library part "0.5W Resistor", "RES 1.2M OHM 5% 1/2W AXIAL", Case/Package=Conformal, Max Operating Temperature=155°C, Min Operating Temperature=-55°C, Power Rating=500mW, Resistance=1.2MR, Resistance Tolerance=5%, Resistor Type="Metal Film", Temperature Coefficient=200ppm/°C, Voltage Rating=3.5kV, Construction=Cylindrical, Contact Plating=Tin, Diameter=4mm, Length=10mm, Military Standard=Not, Mount="Through Hole", Packaging="Ammo Pack", Radiation Hardening=No, Reach SVHC Compliant=Yes, Termination=Axial, Tolerance=5%, Voltage Rating (DC)=3.5kV
U1: "Amplifier IC 1-Channel (Mono) Class AB 5-PENTAWATT", Package="Pentawatt-5 STMicroelectronics", Check_prices=https://www.snapeda.com/parts/TDA2030A/STMicroelectronics/view-part/?ref=eda, MF=STMicroelectronics, MP=TDA2030A, SnapEDA_Link=https://www.snapeda.com/parts/TDA2030A/STMicroelectronics/view-part/?ref=snap
U2 U3: library part NE5532, "Dual Low-Noise Operational Amplifier, 10 to 30 V, 0 to 70 degC, 8-pin DIP (P8), Pb-Free (RoHS)", Manufacturer="Texas Instruments", Total Supply Voltage(Max)(+5V is 5, +/-5V is 10)=30, Total Supply Voltage(Min)(+5V is 5, +/-5V is 10)=10, CMRR(Min)(dB)=70, Code_JEDEC=MS-001, ComponentLink1Description="Manufacturer URL", ComponentLink1URL=http://www.ti.com/, ComponentLink2Description=Datasheet, ComponentLink2URL=http://www.ti.com/lit/ds/symlink/ne5532a.pdf, ComponentLink3Description="Package Specification", ComponentLink3URL=http://www.ti.com/litv/pdf/mpdi001b, DatasheetVersion=SLOS075I, Eco-Plan="Pb-Free (RoHS)", GBW(Typ)(MHz)=10, IIB(Max)(pA)=800000, Iq per channel(Max)(mA)=4, Mounting Technology="Through Hole", Number of Channels=2, PackageDescription="8-Pin Plastic In-Line, Body 9.59 x 6.35 mm, Pitch 2.54 mm", PackageReference=P0008A, PackageVersion="4040082/E, 04/2010", PartNumber=NE5532AP, Slew Rate(Typ)(V/us)=9, Sub Family="General Purpose Amplifier, High Supply Voltage Amplifier (>=30V), Low Noise Amp (<=10nV/rtHz)", Vio (25C)(Max)(mV)=4, Vn at 1kHz(Typ)(nV/rtHz)=5

## Free pads (board coordinates)
  round 160 hole 137.79: 22(570,1740) 23(390,170) 24(3190,440) 25(2480,990) 26(2140,2080)

## Via types
v1: diameter 50, hole 28, Top Layer to Bottom Layer, 7 vias

## Nets (pads, with @x,y where several pads share a name; then routed paths per layer and width w, separated by ;. In a path a pad name is that pad's centre, name@x,y a point inside that pad or via, vN(x,y) a via of type N, cw(c..) or ccw(c..) an arc to the next point about the centre after c; other vN are vias at no path point)
12V: C1.1 C2.2 D1.C J_Pow_in.1 R6.2 U1.5 U2.8 U3.8 | length 7064.7
  Top Layer w20: J_Pow_in.1 510.63,1020 C1.1 ; R6.2 1020,1370 1272.93,1622.93 1864.81,1622.93 1881.88,1640 v1(1890,1640) 1890,1500 U3.8 ; U1.5 2612.52,502.52 D1.C
  Top Layer w30: J_Pow_in.1 300.67,1400.67 480,1580 630,1580 890,1840 960,1840 1080,1960 1470,1960 1790,1640 v1(1890,1640)
  Bottom Layer w20: U2.8 1879.41,660 C2.2 2019.41,800.59 1780,1040 1780,1250 U3.8
  Bottom Layer w30: v1(1890,1640) 1933.75,1596.25 1933.75,1386.25 1973.54,1346.46 2050.55,1346.46 2150,1247 2150,730 2300,580 2406.9,580 2457.64,529.26 2457.64,527.97 2475.21,510.4 2519.05,510.4 U1.5
-12V: C4.2 D2.A J_Pow_in.3 U1.3 U2.4 U3.4 | length 5951.3
  Top Layer w30: C4.2 590,830 480,830 J_Pow_in.3 100,860.91 100,260 300,60 1180,60 v1(1250,130) ; U3.4 1360,970 1360,540 1180,360 U2.4 1145,235 v1(1250,130) ; D2.A 2694.52,744.52 2654.52,744.52 2432.59,522.59 2426.44,522.59 2406.37,502.52 U1.3 2393.07,498 2440,451.07 2440,150 2330,40 1340,40 v1(1250,130)
GND: Audio_out.2 C1.2 C2.1 C3.1 C4.1 C7.2 C8.2 J_HPO.2 J_Pow_in.2 LED.1@260,1600 LED.2@360,1600 R9.1 R13.1 R16.2 U2.3 U3.3 | length 9560.2
  Top Layer w20: C1.2 589.37,1018.44 578.74,1029.07 C7.2 795,1270 C4.1 ; R9.1 918.19,1393.19 C4.1 ; U2.3 1290,605 1290,1000 U3.3 1390,1140 980,1140 835,1285 C4.1 ; C2.1 2198.75,703.75 2198.75,1038.75 2620,1460 Audio_out.2 2510,1460 2500,1470 2453.15,1470 R16.2
  Top Layer w30: C8.2 2960,410 3200,650 C3.1
  Bottom Layer w20: J_Pow_in.2 300.67,1170.65 286.45,1184.88 286.45,1190.18 271.31,1205.32 266.12,1205.32 166.63,1304.81 166.63,1476.63 270,1580 480,1580 578.74,1481.26 C7.2 ; R9.1 935.17,1762.69 972.69,1762.69 1120,1910 1758.85,1910 1760.82,1908.04 1783.54,1908.04 J_HPO.2
  Bottom Layer w30: U2.3 1470,135 v1(1470,130) ; R13.1 1553.15,463.15 1540,450 1540,200 v1(1470,130) ; C2.1 2126.17,418.83 2126.17,373.83 v1(2130,370) ; C8.2 2745.74,295.74 2204.26,295.74 v1(2130,370) ; v1(1470,130) 1550,50 1960,50 2130,220 v1(2130,370)
LEDInd: J_HPO.1 R5.2 R9.3 U3.1 U3.5 | length 2467.8
  Top Layer w20: v1(1530,1577.93) 1530,1440 U3.1 U3.5 1898.43,831.57 R5.2
  Bottom Layer w20: R9.3 1301.81,1808.19 v1@1530,1580 ; v1(1530,1577.93) v1@1530,1580 ; J_HPO.1 1890,1790 1680,1580 v1@1530,1580
Net5V_1: 5V.1 DS1.1 R14.1 | length 1942.2
  Top Layer w20: DS1.1 2750,1440 v1(2750,1710) ; 5V.1 3080,2068.43 v1(3080,1630)
  Bottom Layer w20: v1(2750,1710) 2830,1630 v1(3080,1630) ; 5V.1 3071.57,2228.43 R14.1
Net5V_2: 5V.2 R15.1 | length 400.4
  Top Layer w20: 5V.2 2920,1856.85 R15.1
NetAudio_out_1: Audio_out.1 C6.2 | length 415.9
  Bottom Layer w20: C6.2 2591.57,1520 Audio_out.1
NetC3_2: C3.2 R11.1 | length 199.2
  Bottom Layer w20: R11.1 3190,1030.59 C3.2
NetC5_1: C5.1 R7.2 U1.1 | length 1775.5
  Bottom Layer w30: R7.2 1225.59,1362.44 1225.59,1385.59 1282.72,1442.72 1747.28,1442.72 1820,1370 1820,1120 C5.1 1900,1040 1980,1040 2090,930 2090,671.73 U1.1
NetC5_2: C5.2 R9.2 | length 1225.4
  Bottom Layer w20: R9.2 1390,1510 1820,1510 1880,1450 1880,1180 1884.03,1175.97 1884.03,1142.77 C5.2
NetC6_1: C6.1 D1.A D2.C R10.2 R11.2 U1.4 | length 2695.2
  Top Layer w20: C6.1 2151.26,1581.26 2336.85,1766.85 R10.2 2850,1700 2780,1630 2780,1230 ; U1.4 2460,810 D2.C 2700,1150 2780,1230 ; D1.A 2860,1150 2780,1230
  Bottom Layer w20: R10.2 2866.85,1766.85 2940,1840 3174.33,1840 R11.2
NetC7_1: C7.1 R6.1 R7.1 R13.2 | length 1483.9
  Bottom Layer w20: C7.1 500,1180 550,1130 853.15,1130 R6.1 R7.1 1263.15,920 1696.85,920 R13.2
NetC8_1: C8.1 R12.1 | length 266.5
  Bottom Layer w20: C8.1 3010,638.74 R12.1
NetD3_A: D3.A LED.2@2590,2170 R14.2 | length 794.9
  Bottom Layer w20: LED.2@2590,2170 2780,1980 2780,1925.18 2778.98,1924.16 2778.98,1898.98 D3.A 2778.98,1890 3126.85,1890 R14.2
NetD3_C: D3.C LED.1@2490,2170 Q1.1 | length 737.6
  Top Layer w20: Q1.1 2142.5,1852.5 2142.5,1904.81 2197.69,1960 2320,1960 2390,1890 D3.C
  Bottom Layer w20: D3.C 2490,1910 LED.1@2490,2170
NetDS1_2: DS1.2 R16.1 | length 441.2
  Top Layer w20: R16.1 2380,1003.15 2380,1031.42 2460.93,1112.35 2522.35,1112.35 DS1.2
NetJ_From_Filters_1: J_From_Filters.1 R8.1 | length 419.5
  Top Layer w30: J_From_Filters.1 388.43,381.57 R8.1
NetJ_From_Filters_2: J_From_Filters.2 R3.1 | length 391.9
  Top Layer w30: J_From_Filters.2 455,480 R3.1
NetJ_From_Filters_3: J_From_Filters.3 R2.1 | length 364.6
  Top Layer w30: J_From_Filters.3 514.72,578.43 R2.1
NetQ1_2: Q1.2 R17.1 | length 1123.8
  Top Layer w20: R17.1@2020,894.62 2020,1050 2100,1130 2100,1400 2020,1480 2020,1670 2040,1690 2050,1690 2100,1740 2168.28,1740 2180,1751.72 Q1.2
NetQ1_3: Q1.3 R15.2 | length 973.4
  Bottom Layer w20: Q1.3 2260,1840 2350,1750 2633.15,1750 R15.2
NetR1_1: R1.1 U2.1 U2.5 | length 672.2
  Top Layer w20: R1.1 1024.66,707.81 1097.19,707.81 U2.1
  Bottom Layer w20: U2.1 U2.5
NetR1_2: R1.2 R2.2 R3.2 R8.2 U2.2 | length 933
  Top Layer w20: R1.2 751.57,598.43 864.41,485.59 1001.26,485.59 R2.2 ; R8.2 R3.2 1006.85,321.85 R2.2 ; U2.2 1143.22,558.22 1102.6,558.22 1024.38,480 R2.2
NetR4_1: R4.1 U2.6 U2.7 | length 524.3
  Top Layer w20: R4.1@1159.07,845.93 R4.1 ; U2.6 U2.7
  Bottom Layer w20: R4.1@1159.07,845.93 U2.7
NetR4_2: R4.2 R5.3 U3.2 | length 1234.1
  Top Layer w20: U3.2 1590,1040 R4.2 1590,783.13 1540,733.13 1540,293.15 1652.97,180.18 1692.97,180.18 R5.3
NetR10_1: R10.1 R12.2 U1.2 | length 1275.8
  Bottom Layer w20: U1.2 2556.14,890 2920,890 3010,980 R12.2 2850,1270 R10.1
NetR17_2: R17.2 U3.6 U3.7 | length 459.7
  Top Layer w20: U3.7 1710,1146.98 1727.57,1129.41 1786.11,1129.41 1953.56,1296.85 R17.2
pads on no net: R1.3 R5.1

## Other copper
Top Layer:
  region: 1904.68,96.36 1904.68,92.21 1911.95,92.21 1911.95,98.44 1904.68,98.44 1904.68,97.4
  region: 1917.14,93.25 1917.14,92.21 1929.61,92.21 1929.61,98.44 1917.14,98.44 1917.14,94.29
  region: 1742.6,97.4 1742.6,98.44 1735.32,98.44 1735.32,92.21 1742.6,92.21 1742.6,93.25 1743.64,93.25 1743.64,97.4
  region: 1641.82,98.44 1638.7,98.44 1638.7,97.4 1637.66,97.4 1637.66,94.29 1644.94,94.29 1644.94,95.32 1645.97,95.32 1645.97,97.4 1644.94,97.4 1644.94,98.44 1642.86,98.44
  region: 2029.35,98.44 2023.12,98.44 2023.12,97.4 2022.08,97.4 2022.08,92.21 2029.35,92.21 2029.35,93.25 2030.39,93.25 2030.39,97.4 2029.35,97.4
  region: 2195.58,98.44 2195.58,97.4 2194.55,97.4 2194.55,96.36 2201.82,96.36 2201.82,97.4 2200.78,97.4 2200.78,98.44 2196.62,98.44
  region: 1575.32,98.44 1574.29,98.44 1574.29,97.4 1573.25,97.4 1573.25,96.36 1580.52,96.36 1580.52,97.4 1579.48,97.4 1579.48,98.44 1576.36,98.44
  region: 1947.27,98.44 1942.08,98.44 1942.08,96.36 1948.31,96.36 1948.31,97.4 1947.27,97.4
  region: 2221.56,94.29 2217.4,94.29 2217.4,95.32 2216.36,95.32 2216.36,96.36 2215.32,96.36 2215.32,98.44 2216.36,98.44 2216.36,99.48 2235.06,99.48 2235.06,100.52 2236.1,100.52 2236.1,101.56 2216.36,101.56 2216.36,102.6 2214.29,102.6 2214.29,101.56 2213.25,101.56 2213.25,100.52 2214.29,100.52 2214.29,92.21 2235.06,92.21 2235.06,94.29 2222.6,94.29
  region: 1969.09,96.36 1974.29,96.36 1974.29,98.44 1967.01,98.44 1967.01,96.36 1968.05,96.36
  region: 1776.88,94.29 1770.65,94.29 1770.65,92.21 1777.92,92.21 1777.92,94.29
  region: 1522.34,95.32 1522.34,98.44 1515.06,98.44 1515.06,97.4 1514.03,97.4 1514.03,95.32 1515.06,95.32 1515.06,94.29 1522.34,94.29
  region: 1598.18,98.44 1592.99,98.44 1592.99,96.36 1599.22,96.36 1599.22,97.4 1598.18,97.4
  region: 1795.58,93.25 1795.58,97.4 1794.55,97.4 1794.55,98.44 1771.69,98.44 1771.69,97.4 1770.65,97.4 1770.65,96.36 1782.08,96.36 1782.08,94.29 1783.12,94.29 1783.12,92.21 1795.58,92.21
  region: 2067.79,93.25 2067.79,94.29 2062.6,94.29 2062.6,92.21 2067.79,92.21
  region: 2135.32,97.4 2135.32,93.25 2136.36,93.25 2136.36,92.21 2143.64,92.21 2143.64,98.44 2136.36,98.44 2136.36,97.4

## Silkscreen, mask and mechanical layers (free items; w line width, h text height)
Top Overlay:
  region: 5 vertices and 37 holes, not listed, extent 2401.17,58.18 3201.17,298.18
  text "EN2091 Analog Project" at 1990,50 h50
Bottom Overlay:
  region: 5 vertices and 37 holes, not listed, extent 1477.66,63.12 2277.66,303.12
  text "Designed by DP" at 2650,1213.33 h40
  text "2025/11/09" at 2670,1120 h30
  text "Mixer_Circuit / Team CircuitPirates" at 3130,30 h60
Mechanical 1:
  lines w10: 113.38,1809.71 54.99,1764.98 ; 113.74,1808.12 3279.8,2515.89 ; 3280,2515 cw(c3280,2490.86) 3297.07,2507.93 3300,2505 cw(c3275.86,2480.86) 3310,2480.86 3310,93.28 3263.28,93.28 3227.93,57.93 3227.93,5.01 150,5.01 150,140 10,140 10,390 10,1294.64 ; 10,1294.64 10,1690 cw(c82.43,1690) 31.21,1741.21 40,1750 55,1765 ; 10,1294.64 10,1294.64 ; 54.99,1764.98 55,1765

## Text inside footprints (layer, text, board x,y; h text height)
R9: Mechanical 13 "PCB Edge" at 1098.07,1900.14 h35.43 r193